# Allegro board BeagleY-AI_PCB_Rev-A_240426.brd
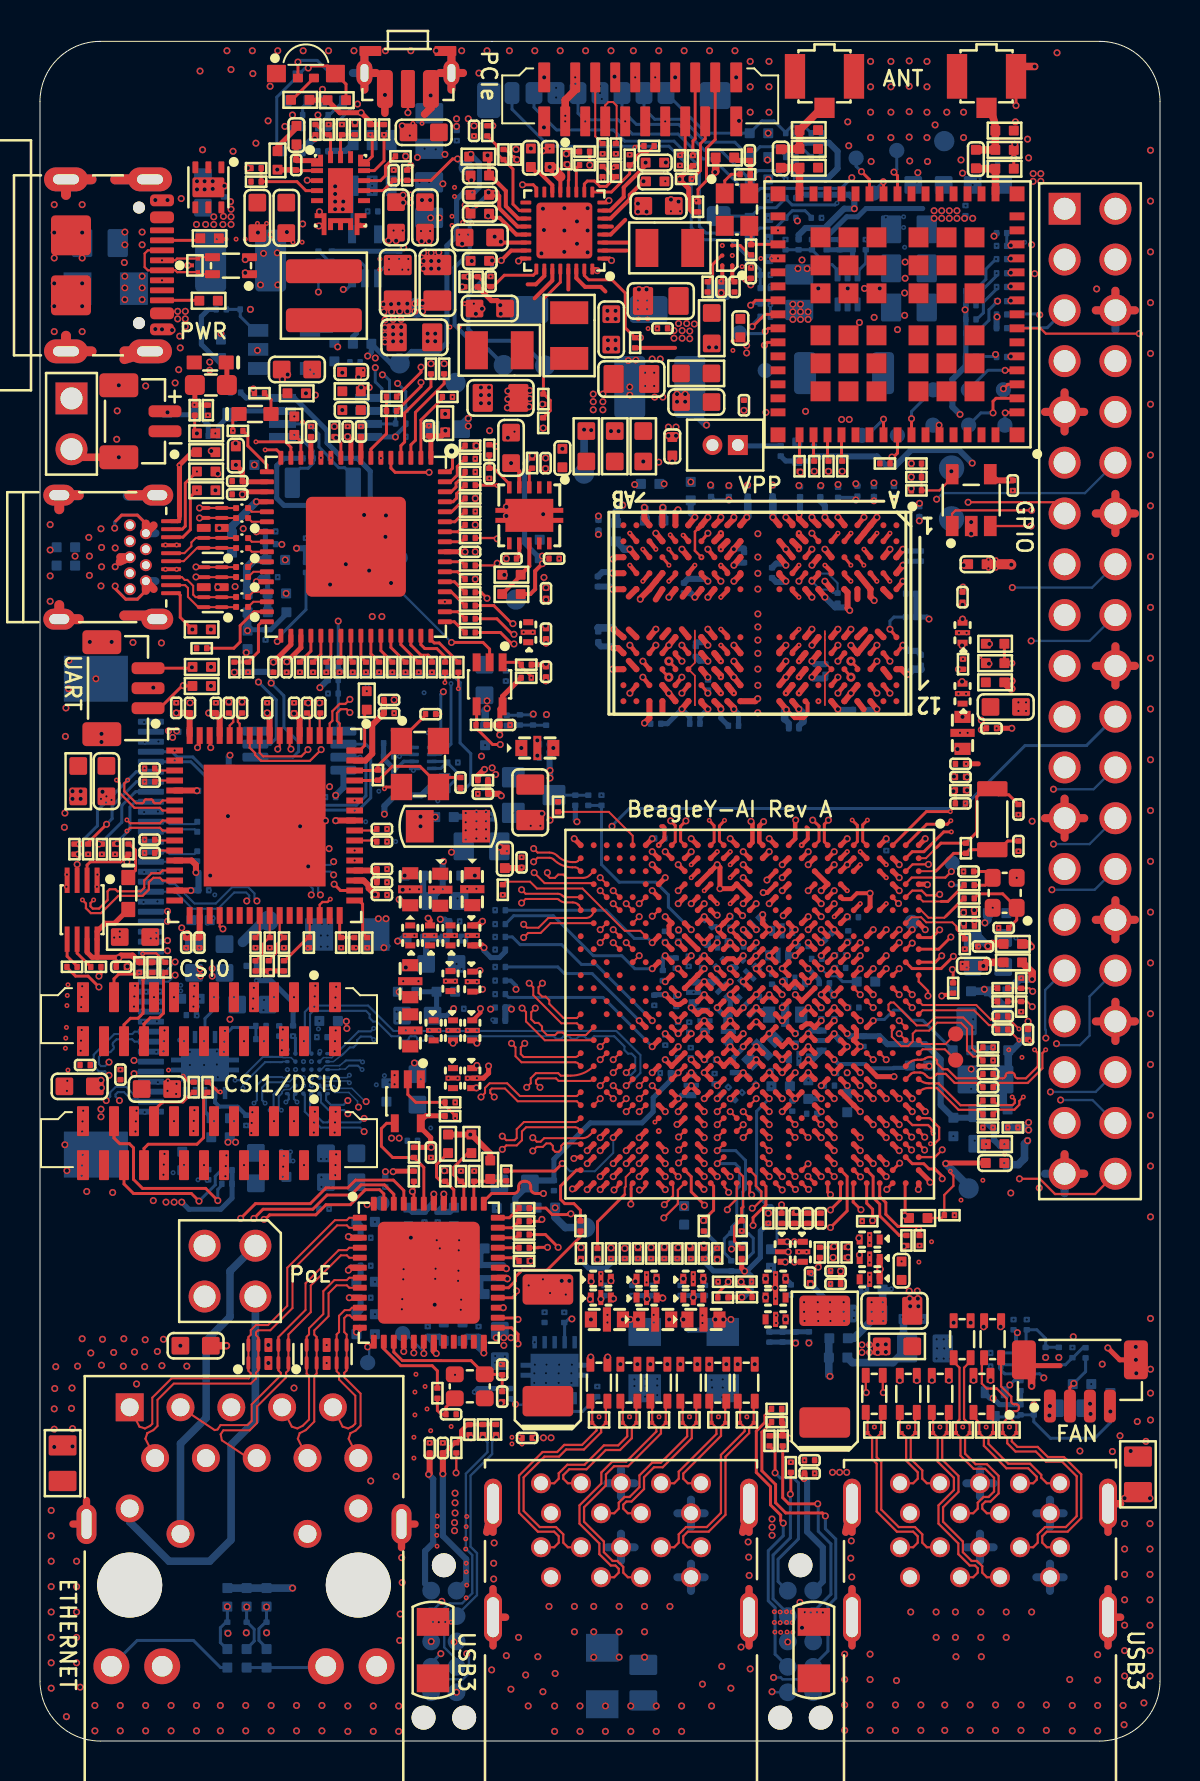
[diagram p0: board, top side]
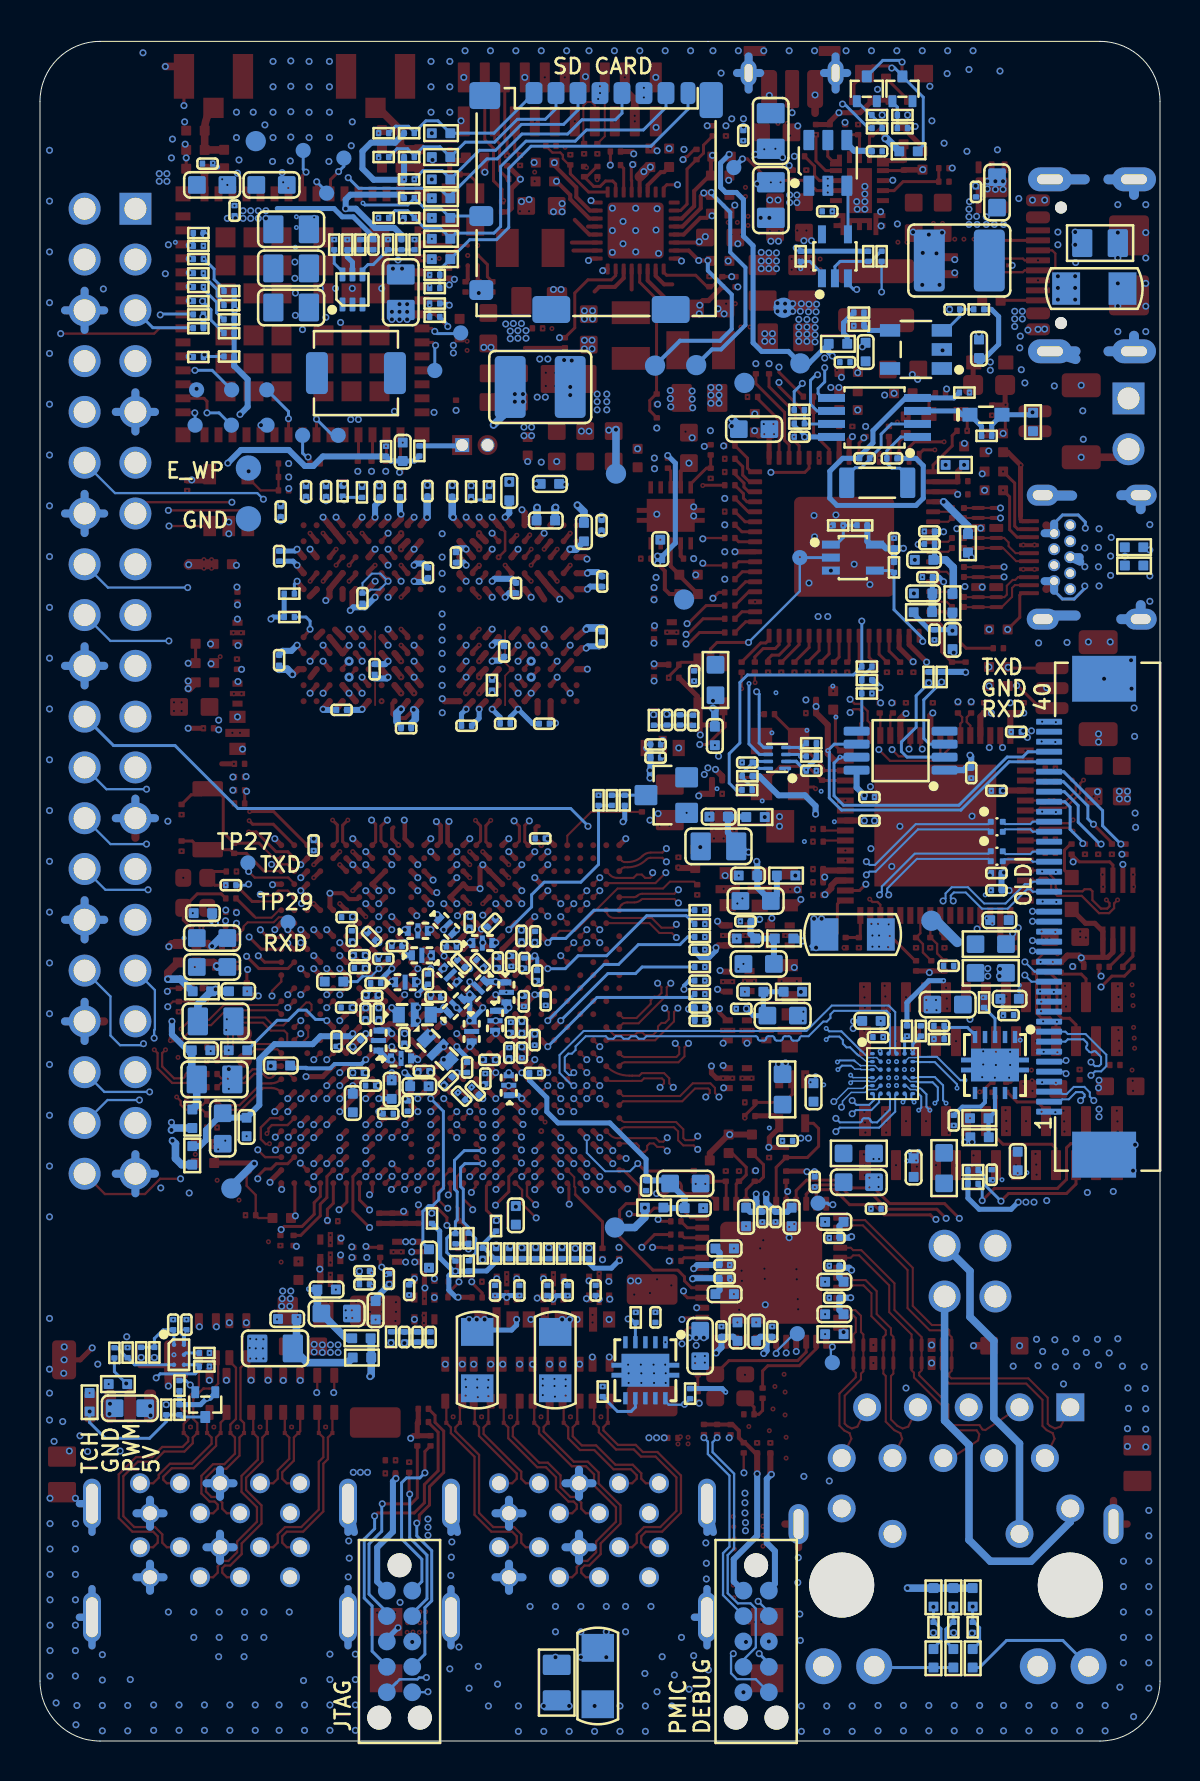
[diagram p1: board, bottom side, seen from below]

Outline 56 x 85 mm; copper layers: TOP, L2-GND1, L3-SIGNAL1, L4-GND2, L5-SIGNAL2, L6-PWR1, L7-PWR2, L8-PWR3, L9-GND, L10-SIGNAL3, L11-GND3, L12-SIGNAL4, L13-GND4, BOTTOM. Coordinates in mm from the lower left corner of the outline.
Outline path: 0,82 0,3 arc(0.88,0.88) 3,0 53,0 arc(55.12,0.88) 56,3 56,82 arc(55.12,84.12) 53,85 3,85 arc(0.88,84.12) 0,82

## Design rules (mm)
constraint set DEFAULT: min track width 0.117
net group B_USB1_DN1_D_P: nets B_USB1_DN1_D_N B_USB1_DN1_D_P
net group B_USB1_DN3_D_P: nets B_USB1_DN3_D_N B_USB1_DN3_D_P
net group B_USB1_SSRX_DN1_P: nets B_USB1_SSRX_DN1_N B_USB1_SSRX_DN1_P
net group B_USB1_SSRX_DN3_P: nets B_USB1_SSRX_DN3_N B_USB1_SSRX_DN3_P
net group B_USB1_SSTX_DN1_P: nets B_USB1_SSTX_DN1_N B_USB1_SSTX_DN1_P
net group B_USB1_SSTX_DN3_P: nets B_USB1_SSTX_DN3_N B_USB1_SSTX_DN3_P
net group C_USB0_DP: nets C_USB0_DM C_USB0_DP
net group C_USB1_SSTX_DN1_P: nets C_USB1_SSTX_DN1_N C_USB1_SSTX_DN1_P
net group C_USB1_SSTX_DN2_P: nets C_USB1_SSTX_DN2_N C_USB1_SSTX_DN2_P
net group C_USB1_SSTX_DN3_P: nets C_USB1_SSTX_DN3_N C_USB1_SSTX_DN3_P
net group C_USB1_SSTX_DN4_P: nets C_USB1_SSTX_DN4_N C_USB1_SSTX_DN4_P
net group C_USBA_SSRX_UP_N: nets C_USBA_SSRX_UP_N C_USBA_SSRX_UP_P
net group CSI0_RX0: nets CSI0_RX0_N CSI0_RX0_P
net group CSI0_RX1: nets CSI0_RX1_N CSI0_RX1_P
net group CSI0_RX2: nets CSI0_RX2_N CSI0_RX2_P
net group CSI0_RX3: nets CSI0_RX3_N CSI0_RX3_P
net group CSI0_RXCLK: nets CSI0_RXCLK_N CSI0_RXCLK_P
net group DP5: nets USB0_DM USB0_DP
net group DSI/CSI_CLK_P: nets DSI/CSI_CLK_N DSI/CSI_CLK_P
net group DSI/CSI_D0_N: nets DSI/CSI_D0_N DSI/CSI_D0_P
net group DSI/CSI_D1_N: nets DSI/CSI_D1_N DSI/CSI_D1_P
net group DSI/CSI_D2_P: nets DSI/CSI_D2_N DSI/CSI_D2_P
net group DSI/CSI_D3_N: nets DSI/CSI_D3_N DSI/CSI_D3_P
net group H20/MMC1_DAT1/ADJ: nets H20/MMC1_DAT1/ADJ SD_DAT1
net group H23/MMC1_DAT0/ADJ: nets H23/MMC1_DAT0/ADJ SD_DAT0
net group H24/MMC1_CLK/ADJ: nets H24/MMC1_CLK/ADJ SD_CLK
net group H25/MMC1_DAT3/ADJ: nets H25/MMC1_DAT3/ADJ SD_DAT3
net group HDMI_TX0-: nets HDMI_TX0+ HDMI_TX0-
net group HDMI_TX1+: nets HDMI_TX1+ HDMI_TX1-
net group HDMI_TX2-: nets HDMI_TX2+ HDMI_TX2-
net group HDMI_TXC-: nets HDMI_TXC+ HDMI_TXC-
net group J23/MMC1_DAT2/ADJ: nets J23/MMC1_DAT2/ADJ SD_DAT2
net group PCIE0_RX0: nets PCIE0_RX0_N PCIE0_RX0_P
net group PCIE0_TX0: nets PCIE0_TX0_N PCIE0_TX0_P
net group PHY_TD_A_M: nets PHY_TD_A_M PHY_TD_A_P
net group PHY_TD_B_M: nets PHY_TD_B_M PHY_TD_B_P
net group PHY_TD_C_M: nets PHY_TD_C_M PHY_TD_C_P
net group PHY_TD_D_M: nets PHY_TD_D_M PHY_TD_D_P
net group SERDES0_REFCLK: nets SERDES0_REFCLK_N SERDES0_REFCLK_P
net group SERDES0_RX0: nets SERDES0_RX0_N SERDES0_RX0_P
net group SERDES0_TX0_: nets SERDES0_TX0_N SERDES0_TX0_P
net group SERDES1_REFCLK: nets SERDES1_REFCLK_N SERDES1_REFCLK_P
net group SERDES1_REFCLK_N_R: nets SERDES1_REFCLK_N_R SERDES1_REFCLK_P_R
net group SERDES1_RX0: nets SERDES1_RX0_N SERDES1_RX0_P
net group SERDES1_TX0: nets SERDES1_TX0_N SERDES1_TX0_P
net group SOC_SERDES1_REFCLK: nets PCIE0_CLK_N PCIE0_CLK_P
net group T_USB1_DN2_D_N: nets T_USB1_DN2_D_N T_USB1_DN2_D_P
net group T_USB1_DN4_D_P: nets T_USB1_DN4_D_N T_USB1_DN4_D_P
net group T_USB1_SSRX_DN2_P: nets T_USB1_SSRX_DN2_N T_USB1_SSRX_DN2_P
net group T_USB1_SSRX_DN4_P: nets T_USB1_SSRX_DN4_N T_USB1_SSRX_DN4_P
net group T_USB1_SSTX_DN2_P: nets T_USB1_SSTX_DN2_N T_USB1_SSTX_DN2_P
net group T_USB1_SSTX_DN4_P: nets T_USB1_SSTX_DN4_N T_USB1_SSTX_DN4_P
net group TX0M: nets TX0M TX0P
net group TX1M: nets TX1M TX1P
net group TX2M: nets TX2M TX2P
net group TXCM: nets TXCM TXCP
net group USB1_DN1_D_P: nets USB1_DN1_D_N USB1_DN1_D_P
net group USB1_DN2_D_N: nets USB1_DN2_D_N USB1_DN2_D_P
net group USB1_DN3_D_P: nets USB1_DN3_D_N USB1_DN3_D_P
net group USB1_DN4_D_P: nets USB1_DN4_D_N USB1_DN4_D_P
net group USB1_HUB_D: nets USB1_HUB_D_N USB1_HUB_D_P
net group USB1_SSRX_DN1_N: nets USB1_SSRX_DN1_N USB1_SSRX_DN1_P
net group USB1_SSRX_DN2_N: nets USB1_SSRX_DN2_N USB1_SSRX_DN2_P
net group USB1_SSRX_DN3_P: nets USB1_SSRX_DN3_N USB1_SSRX_DN3_P
net group USB1_SSRX_DN4_P: nets USB1_SSRX_DN4_N USB1_SSRX_DN4_P
net group USB1_SSTX_DN1_P: nets USB1_SSTX_DN1_N USB1_SSTX_DN1_P
net group USB1_SSTX_DN2_P: nets USB1_SSTX_DN2_N USB1_SSTX_DN2_P
net group USB1_SSTX_DN3_P: nets USB1_SSTX_DN3_N USB1_SSTX_DN3_P
net group USB1_SSTX_DN4_P: nets USB1_SSTX_DN4_N USB1_SSTX_DN4_P
net group USBC_SS_RX0: nets USBC_SS_RX0_N USBC_SS_RX0_P
net group USBC_SS_TX0: nets USBC_SS_TX0_N USBC_SS_TX0_P
net group 40-OHM_PH: nets DDR0_DM0_DBI0# DDR0_DM1_DBI1# DDR0_DM2_DBI2# DDR0_DM3_DBI3# DDR0_DQ0 DDR0_DQ1 DDR0_DQ2 DDR0_DQ4 DDR0_DQ14 DDR0_DQ15 DDR0_DQ18 DDR0_DQ20 DDR0_DQ21 DDR0_DQ24 DDR0_DQ26 DDR0_DQ27 DDR0_DQ28
net group 50-OHM_PH: nets DDR0_CAL0 DDR0_ODT_CA_A DDR0_ODT_CA_B DDR0_RST# DDR0_ZQ0 DDR0_ZQ1
net group 80-OHM_PH: nets DDR0_DQS0_P DDR0_DQS1_N DDR0_DQS3_N
net group CLS1_OLDI0: nets OLDI0_A0_N OLDI0_A0_P OLDI0_A1_N OLDI0_A1_P OLDI0_A2_N OLDI0_A2_P OLDI0_A3_N OLDI0_A3_P OLDI0_CLK0_N OLDI0_CLK0_P SOC_OLDI0_CLK0_N SOC_OLDI0_CLK0_P
net group CLS1_RGMII_TX: nets RGMII1_TD0 RGMII1_TD1 RGMII1_TD2 RGMII1_TD3 RGMII1_TX_CTL RGMII1_TXC TX_CLK
net group CLS1_SD: nets H22/MMC1_CMD/ADJ
net group CLS1_WIFI: nets F27/MMC2_CMD/1V8 G26/MMC2_DAT0/1V8 G27/MMC2_DAT1/1V8 H26/MMC2_CLK/1V8 H27/MMC2_DAT2/1V8 J27/MMC2_DAT3/1V8 WL_SDIO_CLK
net group CLS2_OLDI1: nets OLDI0_A4_N OLDI0_A4_P OLDI0_A5_N OLDI0_A5_P OLDI0_A6_N OLDI0_A6_P OLDI0_A7_N OLDI0_A7_P OLDI0_CLK1_N OLDI0_CLK1_P SOC_OLDI0_CLK1_N SOC_OLDI0_CLK1_P
net group CLS2_RGMII_RX: nets RGMII1_RD0 RGMII1_RD1 RGMII1_RD2 RGMII1_RD3 RGMII1_RX_CTL RGMII1_RXC
net group DDR0_CA: nets DDR0_CA0 DDR0_CA1 DDR0_CA2 DDR0_CA3 DDR0_CA4 DDR0_CA5 DDR0_CK_C DDR0_CK_T DDR0_CKE0 DDR0_CKE1 DDR0_CSN0_0 DDR0_CSN0_1 DDR0_CSN1_0 DDR0_CSN1_1
net group DDR0_CLK: nets DDR0_DQS0_N DDR0_DQS1_P DDR0_DQS2_N DDR0_DQS2_P DDR0_DQS3_P
net group DDR0_DL0: nets DDR0_DQ3 DDR0_DQ5 DDR0_DQ6 DDR0_DQ7
net group DDR0_DL1: nets DDR0_DQ8 DDR0_DQ9 DDR0_DQ10 DDR0_DQ11 DDR0_DQ12 DDR0_DQ13
net group DDR0_DL2: nets DDR0_DQ16 DDR0_DQ17 DDR0_DQ19 DDR0_DQ22 DDR0_DQ23
net group DDR0_DL3: nets DDR0_DQ25 DDR0_DQ29 DDR0_DQ30 DDR0_DQ31
net group PWR: nets VCAP_VDDS0 VCAP_VDDS2 VCAP_VDDS6 VDA_PHY_1V8 VPP_1V8
net group VOUT: nets VOUT0_DATA0 VOUT0_DATA1 VOUT0_DATA2 VOUT0_DATA3 VOUT0_DATA4 VOUT0_DATA5 VOUT0_DATA6 VOUT0_DATA7 VOUT0_DATA8 VOUT0_DATA9 VOUT0_DATA10 VOUT0_DATA11 VOUT0_DATA12 VOUT0_DATA13 VOUT0_DATA14 VOUT0_DATA15 VOUT0_DATA16 VOUT0_DATA17 VOUT0_DATA18 VOUT0_DATA19 VOUT0_DATA20 VOUT0_DATA21 VOUT0_DATA22 VOUT0_DATA23 VOUT0_HSYNC VOUT0_PCLK VOUT0_VSYNC

## Placement (name value [footprint] x y rotation side)
C1  22uF  [C0805]  19.46 80.52 270 bottom
C2  100nF  [C0201]  20.84 80.29 270 bottom
C3  10uF  [C0603]  47.4 77.82 180 bottom
C4  10uF  [C0603]  44.42 77.82 180 bottom
C5  100nF  [C0201]  47.62 78.89 180 bottom
C6  100nF  [C0201]  9.2 77.47 90 bottom
C7  10uF  [C0603]  8.15 77.45 90 bottom
C8  22uF  [C0805]  19.46 77.06 90 bottom
C9  100nF  [C0201]  16.64 76.5 180 bottom
C10  100nF  [C0201]  46.27 76.53 90 bottom
C11  22uF  [C0805]  43.44 71.69 180 bottom
C12  22uF  [C0805]  43.44 73.65 180 bottom
C13  22uF  [C0805]  43.44 75.6 180 bottom
C14  100uF  [C1210]  10.03 74.04 0 bottom
C15  1nF  [C1206]  3.28 72.64 180 bottom
C16  100nF  [C0201]  10.27 71.6 0 bottom
C17  22uF  [C0805]  37.96 72.46 90 bottom
C18  120pF  [C0201]  39.33 74.83 270 bottom
C19  1uF  [C0402]  9.05 69.63 90 bottom
C20  2.2uF  [C0402]  14.72 69.46 90 bottom
C21  100nF  [C0201]  15.75 68.96 0 bottom
C22  100uF  [C1210]  30.99 67.72 0 bottom
C23  10uF  [C0603]  20.3 65.61 180 bottom
C24  100nF  [C0201]  18.03 65.23 0 bottom
C25  2.2uF  [C0402]  37.86 64.48 90 bottom
C26  2.4pF  [C0201]  14.77 64.15 0 bottom
C27  2.4pF  [C0201]  13.4 64.15 180 bottom
C28  10uF  [C0402]  30.51 62.87 180 bottom
C29  10nF  [C0201]  36.63 62.51 90 bottom
C30  1uF  [C0402]  32.54 62.51 90 bottom
C31  10nF  [C0201]  35.39 62.5 90 bottom
C32  10nF  [C0201]  42.7 62.49 90 bottom
C33  100nF  [C0201]  41.7 62.49 90 bottom
C34  10nF  [C0201]  38 62.48 90 bottom
C35  10nF  [C0201]  39.02 62.48 90 bottom
C36  10nF  [C0201]  43.97 61.48 90 bottom
C37  1uF  [C0402]  30.71 61.04 180 bottom
C38  10nF  [C0201]  27.92 60.8 90 bottom
C39  10nF  [C0201]  11.53 60.49 0 bottom
C40  1uF  [C0402]  28.8 60.46 90 bottom
C41  100nF  [C0201]  13.3 59.9 90 bottom
C42  100nF  [C0201]  11.53 59.86 0 bottom
C43  10uF  [C0402]  24.99 59.62 90 bottom
C44  10nF  [C0201]  44.04 59.26 90 bottom
C45  10nF  [C0201]  35.2 59.19 90 bottom
C46  10uF  [C0402]  11.8 59.07 0 bottom
C47  10nF  [C0201]  36.6 58.42 270 bottom
C48  100nF  [C0201]  11.63 58.21 0 bottom
C49  100nF  [C0201]  27.89 57.99 270 bottom
C50  100nF  [C0201]  32.2 57.66 270 bottom
C51  10uF  [C0402]  11.84 57.39 0 bottom
C52  10nF  [C0201]  39.88 57.15 270 bottom
C53  100nF  [C0201]  11.28 55.32 270 bottom
C54  10nF  [C0201]  27.92 55.22 90 bottom
C55  10uF  [C0402]  10.38 55.07 270 bottom
C56  10nF  [C0201]  32.79 54.49 90 bottom
C57  10nF  [C0201]  44.04 54.05 270 bottom
C58  10nF  [C0201]  39.27 53.6 270 bottom
C59  100nF  [C0201]  23.29 53.26 270 bottom
C60  10nF  [C0201]  40.92 51.57 0 bottom
C61  100nF  [C0201]  24.65 51.06 90 bottom
C62  100nF  [C0201]  23.99 51.06 90 bottom
C63  100nF  [C0201]  23.34 51.05 90 bottom
C64  10nF  [C0201]  32.74 50.88 0 bottom
C65  10nF  [C0201]  30.79 50.88 180 bottom
C66  10nF  [C0201]  34.67 50.77 0 bottom
C67  10nF  [C0201]  37.69 50.65 0 bottom
C68  100nF  [C0201]  7.19 50.47 0 bottom
C69  10uF  [C0402]  22.26 50.27 270 bottom
C70  100nF  [C0201]  25.22 49.84 180 bottom
C71  100nF  [C0201]  25.22 49.18 180 bottom
C72  100nF  [C0201]  9.44 48.41 270 bottom
C73  100nF  [C0201]  8.18 47.52 0 bottom
C74  100nF  [C0201]  14.53 47.2 180 bottom
C75  1uF  [C0402]  22.07 46.23 0 bottom
C76  100nF  [C0201]  14.53 46.03 180 bottom
C77  100nF  [C0201]  30.99 45.14 0 bottom
C78  100nF  [C0201]  42.32 44.78 270 bottom
C79  22uF  [C0805]  22.08 44.74 0 bottom
C80  100nF  [C0201]  8.18 43.41 0 bottom
C81  1uF  [C0402]  20.6 43.28 0 bottom
C82  100nF  [C0201]  46.46 42.8 0 bottom
C83  100nF  [C0201]  8.18 42.55 0 bottom
C84  4.7uF  [C0603]  20.22 42.01 0 bottom
C85  1uF  [C0402]  47.85 41.4 0 bottom
C86  100nF  [C0201]  40.67 41.2 0 bottom
C87  100nF  [C0201]  20.73 40.99 0 bottom
C88  100nF  [C0201]  34.52 40.95 270 bottom
C89  100nF  [C0201]  33.43 40.9 135 bottom
C90  1uF  [EMIFIL_0402_3P]  35.68 40.76 225 bottom
C91  1uF  [C0402]  8.03 41.05 0 bottom
C92  1uF  [EMIFIL_0402_3P]  37.11 40.52 180 bottom
C93  100uF  [C1206]  15.37 40.34 180 bottom
C94  100nF  [C0201]  40.41 40.26 90 bottom
C95  100nF  [C0201]  31.93 40.26 90 bottom
C96  100nF  [C0201]  31.24 40.24 90 bottom
C97  100nF  [C0201]  39.42 40.24 45 bottom
C98  4.7uF  [C0603]  47.4 40.16 0 bottom
C99  1uF  [C0402]  20.7 40.13 0 bottom
C100  1uF  [EMIFIL_0402_3P]  33.88 39.91 180 bottom
C101  100nF  [C0201]  38.15 39.76 0 bottom
C102  100nF  [C0201]  35.43 39.73 180 bottom
C103  100nF  [C0201]  23.01 39.58 180 bottom
C104  100nF  [C0201]  40.03 39.3 0 bottom
C105  1uF  [EMIFIL_0402_3P]  36.91 39.29 180 bottom
C106  100nF  [C0201]  38.84 39.12 180 bottom
C107  100nF  [C0201]  32.43 39 270 bottom
C108  100nF  [C0201]  33.1 38.93 270 bottom
C109  100nF  [C0201]  31.78 38.91 90 bottom
C110  100nF  [C0201]  33.98 38.89 45 bottom
C111  100nF  [C0201]  34.95 38.87 45 bottom
C112  4.7uF  [C0603]  20.07 38.86 0 bottom
C113  4.7uF  [C0603]  47.4 38.71 0 bottom
C114  100nF  [C0201]  40.03 38.66 0 bottom
C115  100nF  [C0201]  10.57 38.77 0 bottom
C116  1uF  [EMIFIL_0402_3P]  35.48 38.31 225 bottom
C117  100nF  [C0201]  31.14 38.28 90 bottom
C118  100nF  [C0201]  36.6 38.1 90 bottom
C119  100nF  [C0201]  23.01 38.03 180 bottom
C120  1uF  [C0402]  41.3 37.98 0 bottom
C121  1uF  [EMIFIL_0402_3P]  37.74 37.95 180 bottom
C122  100nF  [C0201]  39.22 37.9 0 bottom
C123  1uF  [EMIFIL_0402_3P]  34.09 37.65 315 bottom
C124  1uF  [C0402]  46.09 37.5 180 bottom
C125  1uF  [C0402]  20.29 37.47 0 bottom
C126  10uF  [C0603]  1.98 32.74 180 top
C127  1uF  [EMIFIL_0402_3P]  32.68 37.44 270 bottom
C128  4.7uF  [C0603]  10.62 36.83 0 bottom
C129  100nF  [C0201]  39.4 37.27 0 bottom
C130  100nF  [C0201]  36.22 37.22 180 bottom
C131  1uF  [C0402]  7.52 37.12 0 bottom
C132  100nF  [C0201]  30.72 37.05 270 bottom
C133  100nF  [C0201]  31.81 36.99 270 bottom
C134  1uF  [EMIFIL_0402_3P]  35.21 36.75 135 bottom
C135  100nF  [C0201]  40.69 36.68 0 bottom
C136  100nF  [C0201]  23.01 36.68 180 bottom
C137  100nF  [C0201]  20.94 36.62 0 bottom
C138  100nF  [C0201]  39.73 36.38 90 bottom
C139  100nF  [C0201]  39.06 36.38 270 bottom
C140  10uF  [EMIFIL_0603_3P]  37.26 36.33 180 bottom
C141  100nF  [C0201]  7.57 36.3 0 bottom
C142  4.7uF  [C0603]  18.87 36.28 180 bottom
C143  1uF  [EMIFIL_0402_3P]  33.25 36.02 270 bottom
C144  100nF  [C0201]  23.01 36.02 180 bottom
C145  2.2uF  [C0402]  14.43 36.01 180 bottom
C146  22uF  [C0805]  47.22 35.99 180 bottom
C147  100nF  [C0201]  32.46 35.69 90 bottom
C148  100nF  [C0201]  31.9 35.69 90 bottom
C149  1uF  [EMIFIL_0402_3P]  34.42 35.49 270 bottom
C150  100nF  [C0201]  14.1 35.2 180 bottom
C151  100nF  [C0201]  37.79 35.15 270 bottom
C152  100nF  [C0201]  31.27 35.06 270 bottom
C153  1uF  [EMIFIL_0402_3P]  39.08 35.03 90 bottom
C154  100nF  [C0201]  41.18 34.99 270 bottom
C155  100nF  [C0201]  40.16 34.88 315 bottom
C156  10uF  [EMIFIL_0603_3P]  36.12 34.57 225 bottom
C157  1uF  [C0402]  47.95 34.54 180 bottom
C158  100nF  [C0201]  32.54 34.42 90 bottom
C159  100nF  [C0201]  31.9 34.42 270 bottom
C160  1uF  [EMIFIL_0402_3P]  37.95 34.14 180 bottom
C161  100nF  [C0201]  33.53 34.07 0 bottom
C162  1uF  [C0402]  43.96 33.78 0 bottom
C163  100nF  [C0201]  34.65 33.68 270 bottom
C164  100nF  [C0201]  36.8 33.51 0 bottom
C165  100nF  [C0201]  40.08 33.41 0 bottom
C166  100nF  [C0201]  31.27 33.41 180 bottom
C167  100nF  [C0201]  33.73 33.13 90 bottom
C168  22uF  [C0805]  47.27 33.09 180 bottom
C169  100nF  [C0201]  35.59 33.02 135 bottom
C170  1uF  [EMIFIL_0402_3P]  32.56 32.8 90 bottom
C171  100nF  [C0201]  39.47 32.78 0 bottom
C172  1uF  [C0402]  37.03 32.75 180 bottom
C173  1uF  [C0402]  38.42 32.58 90 bottom
C174  100nF  [C0201]  34.24 32.52 45 bottom
C175  10uF  [C0402]  17.32 32.44 90 bottom
C176  100nF  [C0201]  34.93 32.25 45 bottom
C177  1uF  [C0402]  40.36 31.91 270 bottom
C178  100nF  [C0201]  37.62 31.75 270 bottom
C179  100nF  [C0201]  38.59 31.37 180 bottom
C180  10nF  [C0201]  10.31 31.04 270 bottom
C181  1uF  [C0402]  45.67 30.71 270 bottom
C182  4.7uF  [C0603]  46.86 30.63 270 bottom
C183  10nF  [C0201]  18.62 30.02 0 bottom
C184  10uF  [C0402]  7.11 29.01 270 bottom
C185  10uF  [C0402]  12.32 28.68 90 bottom
C186  100nF  [C0201]  8.42 28.32 270 bottom
C187  10nF  [C0201]  17.27 27.96 270 bottom
C188  10uF  [C0603]  15.06 27.95 180 bottom
C189  4.7uF  [C0603]  23.73 27.88 180 bottom
C190  100nF  [C0201]  25.7 27.78 270 bottom
C191  1uF  [C0402]  23.3 26.65 180 bottom
C192  10nF  [C0201]  14.2 26.62 0 bottom
C193  1uF  [C0402]  32.21 26.29 270 bottom
C194  1uF  [C0402]  20.7 26.21 270 bottom
C195  100nF  [C0201]  19.88 26.21 270 bottom
C196  100nF  [C0201]  19.22 26.21 270 bottom
C197  1uF  [C0402]  18.42 26.21 270 bottom
C198  1uF  [C0402]  16.28 25.96 0 bottom
C199  100nF  [C0201]  16.28 25.17 0 bottom
C200  1uF  [C0402]  21.77 24.63 180 bottom
C201  1uF  [C0402]  36.55 24.13 270 bottom
C202  100nF  [C0201]  21.77 23.81 180 bottom
C203  100nF  [C0201]  16.28 23.77 0 bottom
C204  100nF  [C0201]  39.78 23.5 180 bottom
C205  100nF  [C0201]  21.77 23.15 180 bottom
C206  100nF  [C0201]  38.56 23.11 90 bottom
C207  1uF  [C0402]  16.28 22.97 0 bottom
C208  100nF  [C0201]  39.78 22.83 180 bottom
C209  1uF  [C0402]  41.67 22.58 180 bottom
C210  100nF  [C0201]  37.54 22.56 270 bottom
C211  100nF  [C0201]  33.25 22.53 270 bottom
C212  100nF  [C0201]  32.03 22.53 270 bottom
C213  100nF  [C0201]  30.63 22.53 270 bottom
C214  100nF  [C0201]  28.22 22.53 270 bottom
C215  100nF  [C0201]  29.62 22.53 270 bottom
C216  1uF  [C0402]  21.77 22.35 180 bottom
C217  100nF  [C0201]  16.28 22.17 0 bottom
C218  1uF  [C0402]  39.22 21.54 270 bottom
C219  4.7uF  [C0603]  41.17 21.38 180 bottom
C220  1uF  [C0402]  16.28 21.34 0 bottom
C221  100nF  [C0201]  25.23 21.19 90 bottom
C222  1uF  [C0402]  43.64 21.11 0 bottom
C223  100nF  [C0201]  49.34 20.82 90 bottom
C224  100nF  [C0201]  48.68 20.82 90 bottom
C225  100nF  [C0201]  21.93 20.47 90 bottom
C226  1uF  [C0402]  21.13 20.47 90 bottom
C227  1uF  [C0402]  20.19 20.47 90 bottom
C228  100nF  [C0201]  19.39 20.47 90 bottom
C229  100nF  [C0201]  37.78 20.2 270 bottom
C230  100nF  [C0201]  37.13 20.2 270 bottom
C231  100nF  [C0201]  36.47 20.2 270 bottom
C232  10uF  [C0603]  22.99 19.76 270 bottom
C233  22uF  [C0805]  44.25 19.63 0 bottom
C234  100uF  [C1206]  34.14 19.05 270 bottom
C235  100uF  [C1206]  30.24 19.05 270 bottom
C236  10uF  [C0603]  51.5 16.64 0 bottom
C237  1nF  [C1206]  38.69 4.55 270 top
C238  100nF  [C0201]  21.7 80.52 270 top
C239  10uF  [C0603]  19.18 80.45 180 top
C240  1800pF  [C0402]  12.82 80.31 270 top
C241  100nF  [C0201]  35.49 79.3 90 top
C242  2.2uF  [C0402]  24.54 79.18 90 top
C243  2.2uF  [C0402]  25.48 79.18 90 top
C244  10pF  [C0402]  37.04 79.14 90 top
C245  10pF  [C0402]  46.79 79.12 90 top
C246  2.2uF  [C0402]  30.74 78.94 0 top
C247  10pF  [C0201]  12.81 78.82 90 top
C248  10pF  [C0201]  17.68 78.31 90 top
C249  2.2uF  [C0402]  21.99 78.29 180 top
C250  2.2uF  [C0402]  30.76 78 0 top
C251  2.2uF  [C0402]  21.99 77.33 180 top
C252  10uF  [C0603]  30.93 76.77 0 top
C253  2.2uF  [C0402]  21.99 76.39 180 top
C254  10uF  [C0603]  17.8 76.2 270 top
C255  10uF  [C0603]  19.25 76.2 270 top
C256  10uF  [C0603]  10.87 76.17 270 top
C257  10uF  [C0603]  12.31 76.17 270 top
C258  4.7uF  [C0603]  21.99 75.19 180 top
C259  2.2uF  [C0402]  21.99 74.02 180 top
C260  100nF  [C0201]  35.54 73.41 90 top
C261  100nF  [C0201]  22.53 72.99 90 top
C262  47uF  [C0805]  17.89 72.93 90 top
C263  47uF  [C0805]  19.87 72.93 90 top
C264  100nF  [C0201]  34.07 72.72 270 top
C265  100nF  [C0201]  34.73 72.72 270 top
C266  47uF  [C0805]  31.04 72.02 180 top
C267  10uF  [C0603]  22.49 71.64 180 top
C268  10uF  [C0402]  35.02 70.66 270 top
C269  100nF  [C0201]  31.13 70.65 180 top
C270  10uF  [C0603]  28.56 70.6 270 top
C271  47uF  [C0805]  18.72 70.2 0 top
C272  10uF  [C0603]  12.85 68.59 0 top
C273  10uF  [C0402]  15.56 68.46 0 top
C274  47uF  [C0805]  29.57 68.12 0 top
C275  47uF  [C0805]  23.03 67.17 0 top
C276  10uF  [C0603]  32.82 66.96 180 top
C277  100nF  [C0201]  35.2 66.8 270 top
C278  10uF  [C0402]  15.58 66.56 180 top
C279  100nF  [C0201]  19.45 65.53 90 top
C280  100nF  [C0201]  13.55 65.49 90 top
C281  100nF  [C0201]  15.38 65.49 90 top
C282  100nF  [C0201]  16.04 65.49 90 top
C283  10uF  [C0402]  31.62 64.75 90 top
C284  4.7uF  [C0603]  23.55 64.67 90 top
C285  10uF  [C0402]  9.79 64.28 90 top
C286  1uF  [C0402]  26.12 64.16 90 top
C287  100nF  [C0201]  25.28 63.91 90 top
C288  100nF  [C0201]  9.86 63.01 180 top
C289  100nF  [C0201]  48.64 62.79 270 top
C290  100nF  [C0201]  9.86 62.35 180 top
C291  100nF  [C0201]  21.51 59.47 0 top
C292  10nF  [C0201]  23.57 59.13 180 top
C293  100nF  [C0201]  25.71 59.13 0 top
C294  10uF  [C0402]  46.87 58.85 0 top
C295  10nF  [C0201]  25.3 57.4 90 top
C296  10nF  [C0201]  46.13 57.21 90 top
C297  1uF  [EMIFIL_0402_3P]  24.41 55.45 90 top
C298  1uF  [EMIFIL_0402_3P]  46.13 55.43 90 top
C299  10nF  [C0201]  25.3 55.38 90 top
C300  100nF  [C0201]  11.67 53.7 270 top
C301  100nF  [C0201]  12.33 53.7 270 top
C302  10nF  [C0201]  25.3 53.47 90 top
C303  1uF  [EMIFIL_0402_3P]  46.13 52.38 90 top
C304  100nF  [C0201]  17.45 52.07 0 top
C305  4.7uF  [C0603]  48.29 51.71 0 top
C306  100nF  [C0201]  6.81 51.67 90 top
C307  100nF  [C0201]  7.5 51.67 90 top
C308  100nF  [C0201]  8.79 51.67 90 top
C309  220nF  [C0201]  9.44 51.67 90 top
C310  220nF  [C0201]  10.1 51.67 90 top
C311  100nF  [C0201]  11.36 51.67 90 top
C312  100nF  [C0201]  12.71 51.67 90 top
C313  220nF  [C0201]  13.35 51.67 90 top
C314  220nF  [C0201]  14.02 51.67 90 top
C315  100nF  [C0201]  17.45 51.4 0 top
C316  27pF  [C0201]  19.53 51.35 180 top
C317  100nF  [C0201]  23.25 50.81 0 top
C318  100nF  [C0201]  47.57 50.65 0 top
C319  10uF  [EMIFIL_0603_3P]  46.13 50.42 90 top
C320  10uF  [EMIFIL_0603_3P]  24.87 49.66 0 top
C321  100nF  [C0201]  46.03 48.87 0 top
C322  220nF  [C0201]  5.48 48.64 180 top
C323  100nF  [C0201]  46.03 48.21 0 top
C324  10uF  [C0603]  3.32 48 270 top
C325  220nF  [C0201]  5.48 47.97 180 top
C326  27pF  [C0201]  21.03 47.93 90 top
C327  100nF  [C0201]  22.14 47.37 180 top
C328  22uF  [C0805]  24.51 46.94 270 top
C329  100nF  [C0201]  46.02 46.89 0 top
C330  15pF  [C0201]  48.92 46.58 270 top
C331  100uF  [C1206]  20.4 45.75 0 top
C332  220nF  [C0201]  17.1 45.61 180 top
C333  220nF  [C0201]  5.48 45.08 180 top
C334  220nF  [C0201]  17.1 44.98 180 top
C335  15pF  [C0201]  48.92 44.76 270 top
C336  220nF  [C0201]  5.48 44.42 180 top
C337  1uF  [C0402]  23.24 44.12 90 top
C338  100nF  [C0201]  24.08 43.94 90 top
C339  100nF  [C0201]  17.1 43.61 0 top
C340  15pF  [C0201]  46.43 43.49 180 top
C341  100nF  [C0201]  17.1 42.95 0 top
C342  10uF  [EMIFIL_0603_3P]  21.62 42.6 270 top
C343  10uF  [EMIFIL_0603_3P]  18.51 42.6 90 top
C344  10uF  [EMIFIL_0603_3P]  20.01 42.57 270 top
C345  100nF  [C0201]  17.1 42.31 0 top
C346  15pF  [C0201]  48.18 40.67 180 top
C347  1uF  [EMIFIL_0402_3P]  18.51 40.29 90 top
C348  1uF  [EMIFIL_0402_3P]  19.5 40.29 90 top
C349  1uF  [EMIFIL_0402_3P]  20.52 40.29 90 top
C350  1uF  [EMIFIL_0402_3P]  21.62 40.29 270 top
C351  100nF  [C0201]  7.31 39.93 270 top
C352  100nF  [C0201]  7.97 39.93 270 top
C353  100nF  [C0201]  47.15 39.74 180 top
C354  1uF  [C0402]  46.69 38.77 180 top
C355  100nF  [C0201]  2.26 33.81 180 top
C356  100nF  [C0201]  4.06 38.72 0 top
C357  1uF  [EMIFIL_0402_3P]  20.52 38 270 top
C358  10uF  [EMIFIL_0603_3P]  18.51 38 270 top
C359  1uF  [EMIFIL_0402_3P]  21.62 37.98 270 top
C360  1nF  [C1206]  28.11 3.25 270 bottom
C361  1nF  [C1206]  19.65 4.55 270 top
C362  220nF  [C0201]  48.14 36.24 0 top
C363  220nF  [C0201]  48.14 35.59 0 top
C364  10uF  [EMIFIL_0603_3P]  18.51 35.54 270 top
C365  1uF  [EMIFIL_0402_3P]  19.68 35.54 270 top
C366  1uF  [EMIFIL_0402_3P]  20.65 35.54 270 top
C367  1uF  [EMIFIL_0402_3P]  21.62 35.54 270 top
C368  100nF  [C0201]  49.4 35.34 270 top
C369  220nF  [C0201]  47.4 33.36 0 top
C370  1uF  [EMIFIL_0402_3P]  20.65 33.15 270 top
C371  1uF  [EMIFIL_0402_3P]  21.62 33.15 270 top
C372  10uF  [C0603]  5.84 32.61 0 top
C373  220nF  [C0201]  47.4 32.7 0 top
C374  100nF  [C0201]  4.02 33.33 90 top
C375  100nF  [C0201]  19.54 29.43 270 top
C376  1uF  [C0402]  47.75 28.91 0 top
C377  100nF  [C0201]  37.73 26.14 90 top
C378  100nF  [C0201]  38.38 26.14 90 top
C379  100nF  [C0201]  39.04 26.14 90 top
C380  1uF  [EMIFIL_0402_3P]  41.48 25.08 180 top
C381  1uF  [EMIFIL_0402_3P]  37.14 24.47 270 top
C382  1uF  [EMIFIL_0402_3P]  38.14 24.47 270 top
C383  1uF  [EMIFIL_0402_3P]  41.48 24.1 180 top
C384  1uF  [C0402]  43.08 23.52 90 top
C385  100nF  [C0201]  39.78 23.5 180 top
C386  100nF  [C0201]  38.5 23.18 90 top
C387  1uF  [EMIFIL_0402_3P]  28.04 23.12 0 top
C388  1uF  [EMIFIL_0402_3P]  30.33 23.12 0 top
C389  1uF  [EMIFIL_0402_3P]  32.66 23.12 0 top
C390  1uF  [EMIFIL_0402_3P]  36.78 23.12 0 top
C391  1uF  [EMIFIL_0402_3P]  41.48 23.09 180 top
C392  100nF  [C0201]  39.78 22.86 180 top
C393  1uF  [EMIFIL_0402_3P]  28.04 22.18 0 top
C394  1uF  [EMIFIL_0402_3P]  30.33 22.18 0 top
C395  1uF  [EMIFIL_0402_3P]  32.66 22.18 0 top
C396  1uF  [EMIFIL_0402_3P]  36.78 22.18 0 top
C397  22uF  [C0805]  42.72 21.51 180 top
C398  1uF  [EMIFIL_0402_3P]  36.78 21.09 0 top
C399  10uF  [EMIFIL_0603_3P]  28.35 21.08 0 top
C400  10uF  [EMIFIL_0603_3P]  30.76 21.08 0 top
C401  10uF  [EMIFIL_0603_3P]  33.17 21.08 0 top
C402  150uF  [AVX_C]  25.39 19.79 90 top
C403  100nF  [C0603]  7.78 19.77 180 top
C404  150uF  [AVX_C]  39.24 18.72 90 top
C405  27pF  [C0201]  23.11 18.57 90 top
C406  27pF  [C0201]  23.11 17.22 270 top
C407  27pF  [C0201]  20.55 16.34 0 top
C408  100nF  [C0201]  24.36 15.16 180 top
C409  100nF  [C0201]  19.48 14.65 90 top
C410  100nF  [C0201]  20.14 14.65 90 top
C411  100nF  [C0201]  38.48 14.04 180 top
C412  100nF  [C0201]  38.48 13.39 0 top
C413  100nF  [C0201]  11.05 35.76 0 bottom
C414  100nF  [C0201]  22.47 63.4 270 top
C415  120pF  [C0201]  14.15 79.5 180 bottom
C416  100pF  [C0201]  20.64 48.93 0 bottom
C417  100nF  [C0201]  17.44 48.53 180 bottom
D1  TPD1E1B04DPYR  [D0402]  35.95 80.41 180 bottom
D2  TPD1E1B04DPYR  [D0402]  35.95 79.22 180 bottom
D3  TPD1E1B04DPYR  [D0402]  35.95 78.1 180 bottom
D4  TPD1E1B04DPYR  [D0402]  35.95 77.16 180 bottom
D5  TPD1E1B04DPYR  [D0402]  35.95 76.17 180 bottom
D6  TPD1E1B04DPYR  [D0402]  35.95 75.13 180 bottom
D7  TPD1E1B04DPYR  [D0402]  35.95 74.11 180 bottom
D8  LRB520S-30T1G  [SOD_523]  8.7 66.33 0 bottom
D9  TPD1E1B04DPYR  [D0402]  6.35 65.96 90 bottom
D10  6.8V  [SOT23]  24.68 47.31 180 bottom
D11  TPD1E10B06DPYR  [D0402]  52.1 17.85 180 bottom
D12  TPD1E10B06DPYR  [D0402]  53.52 16.94 270 bottom
D13  TPD1E0B04DPYR  [D0402]  38.44 80.56 180 top
D14  TPD1E0B04DPYR  [D0402]  48.23 80.54 180 top
D15  LRB520S-30T1G  [SOD_523]  8.51 68.94 0 top
D16  LRB520S-30T1G  [SOD_523]  10.75 66.37 180 top
D17  TPD1E10B06DPYR  [D0402]  8.31 65.39 180 top
D18  TPD1E10B06DPYR  [D0402]  8.31 64.45 180 top
D19  TPD1E10B06DPYR  [D0402]  8.31 63.49 180 top
D20  TPD1E10B06DPYR  [D0402]  8.31 62.55 180 top
D21  TPD1E10B06DPYR  [D0402]  8.08 55.59 180 top
D22  TPD1E1B04DPYR  [D0402]  8.09 53.72 180 top
D23  TPD1E1B04DPYR  [D0402]  8.08 52.76 180 top
D24  LRB520S-30T1G  [SOD_523]  4.41 42.38 90 top
D25  ESD122DMXR  [X2SON3_0D3_0_6X1X0_4MM]  27.95 16.06 270 top
D26  ESD122DMXR  [X2SON3_0D3_0_6X1X0_4MM]  29.48 16.06 270 top
D27  ESD122DMXR  [X2SON3_0D3_0_6X1X0_4MM]  30.95 16.06 270 top
D28  ESD122DMXR  [X2SON3_0D3_0_6X1X0_4MM]  32.47 16.06 270 top
D29  ESD122DMXR  [X2SON3_0D3_0_6X1X0_4MM]  33.92 16.06 270 top
D30  ESD122DMXR  [X2SON3_0D3_0_6X1X0_4MM]  35.34 16.06 270 top
D31  ESD122DMXR  [X2SON3_0D3_0_6X1X0_4MM]  41.72 15.55 270 top
D32  ESD122DMXR  [X2SON3_0D3_0_6X1X0_4MM]  43.42 15.55 270 top
D33  ESD122DMXR  [X2SON3_0D3_0_6X1X0_4MM]  45 15.55 270 top
D34  ESD122DMXR  [X2SON3_0D3_0_6X1X0_4MM]  46.14 15.55 270 top
D35  ESD122DMXR  [X2SON3_0D3_0_6X1X0_4MM]  47.31 15.55 270 top
D36  ESD122DMXR  [X2SON3_0D3_0_6X1X0_4MM]  48.48 15.55 270 top
D37  ESD122DMXR  [X2SON3_0D3_0_6X1X0_4MM]  7.75 73.8 0 top
F1  100mA  [F0603]  8.54 67.82 180 top
FB1  120R  [L0402]  10.26 63.82 0 bottom
FB4  120R  [L0402]  10.38 56.9 270 bottom
FB5  120R  [L0402]  11.86 56.45 0 bottom
FB6  120R  [L0402]  20.22 46.21 0 bottom
FB7  120R  [L0402]  18.69 43.28 0 bottom
FB8  120R  [L0402]  18.8 40.13 180 bottom
FB9  120R  [L0402]  47.9 37.49 180 bottom
FB10  120R  [L0402]  18.36 37.47 0 bottom
FB11  120R  [L0402]  48.38 31.12 90 bottom
FB12  120R  [L0402]  48.39 29.29 270 bottom
FB13  120R  [L0402]  25.29 26.68 0 bottom
FB14  120R  [L0402]  39.93 20.14 180 bottom
FB15  120R  [L0402]  39.9 19.18 180 bottom
FB16  120R  [L0402]  34.25 79.19 180 top
FB17  120R  [L0603]  33.59 70.66 90 top
FB18  120R  [L0603]  32.81 68.4 0 top
FB19  120R  [L0402]  15.58 67.5 180 top
FB20  120R  [L0402]  12.83 67.4 180 top
FB21  120R  [L0402]  20.26 65.91 90 top
FB22  120R  [L0603]  30.16 64.75 270 top
FB23  120R  [L0402]  47.75 52.95 0 top
FB24  120R  [L0603]  1.91 48 90 top
FB25  120R  [L0402]  48.64 39.86 0 top
FB26  120R  [L0402]  48.64 38.94 180 top
FB27  120R  [L0603]  42.85 19.74 180 top
FB28  120R  [L0402]  21.92 79.24 180 top
FB29  120R  [L0402]  16.1 69.88 0 bottom
FB30  120R  [L0603]  22.23 53.06 270 bottom
FB31  120R  [L0603]  8.46 39.85 0 bottom
FB32  120R  [L0603]  18.87 32.59 270 bottom
FB33  120R  [L0603]  15.06 29.39 0 bottom
FB34  120R  [L0603]  10.8 28.65 270 bottom
FB35  120R  [L0603]  27.32 64.75 270 top
FB36  120R  [L0603]  28.74 64.75 270 top
FB37  120R  [L0603]  4.75 40.21 0 top
FB38  120R  [L0603]  8.46 38.42 180 bottom
J1  1040310811  [SD-1040310811]  28.19 82.66 0 bottom
J2  0.5K-DX-40PWB  [FPC40_0D5_25_4X5_25X2MM]  5.25 41.22 90 bottom
J3  TC2050-IDC  [CONNECT10_1D27_12_4X6_7MM]  38.02 4.98 270 bottom
J4  TC2050-IDC  [CONNECT10_1D27_12_4X6_7MM]  20.19 4.98 270 bottom
J5  U.FL-R-SMT-1(10)  [U-FL3P-SMD-2_6X2_6X1_0MM]  39.22 83.25 270 top
J6  U.FL-R-SMT-1(10)  [U-FL3P-SMD-2_6X2_6X1_0MM]  47.33 83.25 270 top
J7  MTFP65-816SWN-19A72  [FPC16_0D5_13_7X3_5X3_95MM_90D]  30.01 82.1 0 top
J8  USB2.0 Type C  [USB2_0_TYPE_C]  6.05 73.8 0 top
J9  MTWF63-102SRN-01163  [JST2P_1D0_4_2X3X4_9MM]  6.25 66 270 top
J10  Header 1x2 2.54mm  [HEADER2P_2D54_DIP]  1.57 65.87 0 top
J11  Header 1x2 1.27mm  [HEADER2P_1D27_DIP_TOP]  34.26 64.81 270 top
J12  MTHD54-919000-02B23  [HDMI19P_0D4_6_5X7_95X2_9MM]  4.49 59.2 270 top
J13  MTWF63-103SRN-01163  [JST3P_1D0_5_2X3X4_9MM]  5.4 52.65 270 top
J14  Header 2x20 2.54mm  [HEADER2X20P_2D54_DIP]  52.5 52.5 0 top
J15  MTFP65-822SWN-19A72  [FPC22_0D5_16_7X3_5X3_95MM_90D]  8.45 36.1 0 top
J16  MTFP65-822SWN-19A72  [FPC22_0D5_16_7X3_5X3_95MM_90D]  8.45 29.9 0 top
J17  Header 2x2 2.54mm  [HEADER2X2_2_54]  9.5 23.5 270 top
J18  MTWF63-104SRN-01163  [JST4P_1D0_6_2X3X4_9MM]  52 16.75 180 top
J19  LPJG0926HENLS4R  [RJ45_20P_LPJG0926HENL_SLOT]  10.2 7.8 0 top
J20  UBF30-D2112  [USB3_0_2D0_17_5X13_78X15_49MM_SLOT]  29.05 6.19 0 top
J21  UBF30-D2112  [USB3_0_2D0_17_5X13_78X15_49MM_SLOT]  47 6.19 0 top
L1  0.22uH  [L2P_4_2X4_2X1_9MM]  40.2 68.41 0 bottom
L2  90R  [L4P_0_85X0_65MM]  8.16 45.72 270 bottom
L3  90R  [L4P_0_85X0_65MM]  8.16 44.25 270 bottom
L4  1.5nH  [L0402]  38.44 79.62 0 top
L5  1.5nH  [L0402]  48.23 79.57 0 top
L6  1.5nH  [L0402]  38.44 78.68 0 top
L7  1.5nH  [L0402]  48.23 78.63 0 top
L8  0.47uH  [L1008]  31.49 74.67 0 top
L9  90R  [L2012]  9.55 73.78 180 top
L10  110nH  [L2P_4_3X4_3X2MM]  14.19 72.28 270 top
L11  0.47uH  [L1008]  26.46 70.29 270 top
L12  0.47uH  [L1008]  22.97 69.55 180 top
L13  90R  [L4P_0_85X0_65MM]  10.1 61.41 90 top
L14  90R  [L4P_0_85X0_65MM]  10.1 59.91 90 top
L15  90R  [L4P_0_85X0_65MM]  10.1 58.46 90 top
L16  90R  [L4P_0_85X0_65MM]  10.1 56.97 90 top
L17  90R  [L2012]  46.11 20.1 270 top
L18  90R  [L2012]  47.63 20.1 270 top
L19  90R  [L2012]  27.95 17.92 270 top
L20  90R  [L2012]  29.44 17.92 270 top
L21  90R  [L2012]  30.94 17.92 270 top
L22  90R  [L2012]  32.44 17.92 270 top
L23  90R  [L2012]  33.89 17.92 270 top
L24  90R  [L2012]  35.31 17.92 270 top
L25  90R  [L2012]  41.71 17.36 270 top
L26  90R  [L2012]  43.41 17.36 270 top
L27  90R  [L2012]  45.01 17.36 270 top
L28  90R  [L2012]  47.1 17.36 270 top
LED1  XL-3210SURSYGC  [LED4_3_2X1_5X1_0MM]  13.3 82.95 0 top
NOREF  -  []  52.91 0 90 top
NOREF#2  -  []  0 82 0 top
NOREF#3  -  []  -247.42 -124.5 0 top
NOREF#4  -  []  -586.76 214.75 0 top
OSC1  32.768kHz  [X4-SMD-2_5X2_0X1_0MM]  34.85 76.59 270 top
Q1  CJ1012  [SOT_523]  14.66 82.63 0 bottom
Q2  CJ1012  [SOT_523]  12.88 82.63 0 bottom
Q3  CJ1012  [SOT_523]  47.74 16.83 180 bottom
R1  10K  [R0201]  14.15 81.32 180 bottom
R2  10K  [R0201]  12.88 81.32 180 bottom
R3  0R  [R0201]  12.88 80.66 0 bottom
R4  0R  [R0201]  14.15 80.66 180 bottom
R5  0R  [R0201]  38.82 80.41 180 bottom
R6  47K  [R0201]  37.54 80.41 180 bottom
R7  0R  [R0201]  38.82 79.22 180 bottom
R8  47K  [R0201]  37.54 79.22 180 bottom
R9  47K  [R0201]  37.54 78.1 180 bottom
R10  10K  [R0201]  37.54 77.17 180 bottom
R11  0R  [R0201]  38.82 76.17 180 bottom
R12  47K  [R0201]  37.54 76.17 180 bottom
R13  10K  [R0201]  48.08 75.41 0 bottom
R14  0R  [R0805]  3 74.91 180 bottom
R15  0R  [R0201]  48.08 74.77 180 bottom
R16  10K  [R0201]  17.97 74.25 270 bottom
R17  10K  [R0201]  14.59 74.25 270 bottom
R18  0R  [R0201]  13.92 74.25 90 bottom
R19  0R  [R0201]  48.08 74.11 180 bottom
R20  0R  [R0201]  48.08 73.4 180 bottom
R21  47K  [R0201]  36.27 73.32 180 bottom
R22  0R  [R0201]  48.08 72.72 180 bottom
R23  0R  [R0201]  36.27 72.66 180 bottom
R24  10K  [R0201]  46.55 72.52 0 bottom
R25  0R  [R0201]  48.08 72.01 180 bottom
R26  10K  [R0201]  41.29 74.83 270 bottom
R27  10K  [R0201]  36.27 71.89 0 bottom
R28  10K  [R0201]  46.55 71.81 0 bottom
R29  10K  [R0201]  9.06 71.6 0 bottom
R30  2.2K  [R0201]  48.08 71.34 0 bottom
R31  10K  [R0201]  36.27 71.23 0 bottom
R32  100K  [R0201]  40.63 74.83 90 bottom
R33  10K  [R0201]  46.55 71.09 0 bottom
R34  DNP  [R0201]  15.06 70.78 0 bottom
R35  DNP  [R0201]  15.06 71.44 180 bottom
R36  2.2K  [R0201]  48.08 70.66 0 bottom
R37  453K  [R0201]  39.99 74.83 270 bottom
R38  10K  [R0201]  46.55 70.41 0 bottom
R39  100K  [R0201]  38.6 74.83 90 bottom
R40  10K  [R0201]  37.93 74.83 270 bottom
R41  0R  [R0201]  48.08 69.22 180 bottom
R42  10K  [R0201]  46.55 69.24 0 bottom
R43  0R  [R0201]  37.28 74.83 270 bottom
R44  0R  [R0201]  9.78 67.44 0 bottom
R45  0R  [R0201]  18.03 66.57 180 bottom
R46  10K  [R0201]  18.03 65.89 180 bottom
R47  0R  [R0201]  8.67 65.27 180 bottom
R48  0R  [R0201]  37.03 64.52 270 bottom
R49  10K  [R0201]  38.7 64.5 90 bottom
R50  10K  [R0201]  40.87 62.51 270 bottom
R51  10K  [R0201]  34.44 62.49 90 bottom
R52  10K  [R0201]  33.55 62.49 270 bottom
R53  10K  [R0201]  39.9 62.45 90 bottom
R54  10K  [R0201]  16.09 60.8 0 bottom
R55  10K  [R0201]  14.9 60.8 0 bottom
R56  5.6K  [R0402]  9.6 59.89 270 bottom
R57  10K  [R0201]  13.3 58.7 270 bottom
R58  240R  [R0201]  43.54 57.38 180 bottom
R59  240R  [R0201]  43.54 56.21 180 bottom
R60  0R  [R0201]  14.66 53.73 180 bottom
R61  2.2K  [R0201]  11.58 53.21 270 bottom
R62  2.2K  [R0201]  10.92 53.21 270 bottom
R63  10K  [R0201]  14.66 53.06 0 bottom
R64  10K  [R0201]  33.4 52.81 90 bottom
R65  100K  [R0201]  14.66 52.39 180 bottom
R66  49.9R  [R0201]  25.31 51.06 270 bottom
R67  3.4K  [R0201]  26.76 47.05 270 bottom
R68  10K  [R0201]  28.07 47.04 90 bottom
R69  16.5K  [R0201]  27.41 47.04 90 bottom
R70  499R  [R0201]  23.01 41.55 180 bottom
R71  499R  [R0201]  23.01 40.85 180 bottom
R72  499R  [R0201]  23.01 40.21 180 bottom
R73  499R  [R0201]  23.01 38.71 180 bottom
R74  499R  [R0201]  23.01 37.35 180 bottom
R75  10K  [R0201]  8.8 36.94 270 bottom
R76  10K  [R0201]  11.05 35.1 180 bottom
R77  10K  [R0201]  12.65 35.51 270 bottom
R78  10K  [R0201]  11.96 35.51 90 bottom
R79  3.01K  [R0402]  46.1 34.54 0 bottom
R80  1.69K  [R0402]  9.04 31.15 0 bottom
R81  3.57K  [R0402]  9.02 30.19 180 bottom
R82  2.2K  [R0201]  9.35 28.55 180 bottom
R83  2.2K  [R0201]  9.35 27.86 180 bottom
R84  10K  [R0201]  36.4 26.14 90 bottom
R85  10K  [R0201]  33.2 25.76 90 bottom
R86  10K  [R0201]  34.58 25.14 270 bottom
R87  10K  [R0201]  35.23 25.12 270 bottom
R88  10K  [R0201]  33.87 24.39 270 bottom
R89  10K  [R0201]  33.2 24.38 90 bottom
R90  10K  [R0201]  32.54 24.38 90 bottom
R91  10K  [R0201]  31.88 24.38 90 bottom
R92  10K  [R0201]  31.22 24.38 90 bottom
R93  10K  [R0201]  30.56 24.38 90 bottom
R94  10K  [R0201]  29.9 24.38 90 bottom
R95  10K  [R0201]  29.24 24.38 90 bottom
R96  10K  [R0201]  28.55 24.38 90 bottom
R97  10K  [R0201]  34.56 23.76 90 bottom
R98  10K  [R0201]  35.23 23.75 90 bottom
R99  10K  [R0201]  26.21 21.18 90 bottom
R100  11K  [R0402]  16.28 20.35 0 bottom
R101  49.9R  [R0201]  38.45 20.21 90 bottom
R102  0R  [R0201]  50.94 19.43 270 bottom
R103  0R  [R0201]  50.28 19.43 270 bottom
R104  10K  [R0201]  51.62 19.42 90 bottom
R105  33R  [R0201]  52.28 19.41 270 bottom
R106  0R  [R0201]  47.78 19.41 0 bottom
R107  10K  [R0201]  47.78 18.73 180 bottom
R108  10K  [R0201]  49.03 17.77 90 bottom
R109  20K  [R0201]  27.86 17.48 90 bottom
R110  100K  [R0201]  23.5 17.37 270 bottom
R111  10K  [R0201]  49.69 16.57 270 bottom
R112  10K  [R0201]  49.03 16.57 270 bottom
R113  5.76K  [R0402]  11.33 7.18 270 bottom
R114  5.76K  [R0402]  10.33 7.18 270 bottom
R115  5.76K  [R0402]  9.37 7.18 270 bottom
R116  2.49K  [R0201]  11.33 5.69 270 bottom
R117  2.49K  [R0201]  10.33 5.69 270 bottom
R118  2.49K  [R0201]  9.37 5.69 270 bottom
R119  470R  [R0402]  11.33 4.14 270 bottom
R120  470R  [R0402]  10.33 4.14 270 bottom
R121  470R  [R0402]  9.37 4.14 270 bottom
R122  0R  [R0805]  54.9 13.34 270 top
R123  300R  [R0402]  13.01 82.08 180 top
R124  680R  [R0402]  14.84 82.06 0 top
R125  0R  [R0201]  13.77 80.59 90 top
R126  6.2K  [R0201]  14.43 80.59 90 top
R127  6.2K  [R0201]  15.09 80.59 90 top
R128  0R  [R0201]  15.74 80.59 270 top
R129  2.2K  [R0201]  16.52 80.59 270 top
R130  2.2K  [R0201]  17.2 80.59 270 top
R131  0R  [R0201]  30.45 79.77 180 top
R132  10K  [R0201]  27.23 79.49 0 top
R133  0R  [R0201]  22.36 80.52 270 top
R134  0R  [R0201]  23.17 79.34 90 top
R135  10K  [R0201]  23.81 79.34 270 top
R136  0R  [R0201]  18.03 79.25 180 top
R137  10K  [R0201]  26.33 79.12 270 top
R138  0R  [R0201]  28.8 78.49 270 top
R139  0R  [R0201]  29.48 79.08 270 top
R140  0R  [R0201]  28.13 78.49 270 top
R141  100K  [R0201]  32 79.05 270 top
R142  2.4K  [R0402]  11.88 79.05 90 top
R143  2.2K  [R0201]  32.65 79.04 90 top
R144  0R  [R0201]  27.23 78.81 0 top
R145  0R  [R0201]  10.81 78.66 0 top
R146  10K  [R0201]  35.26 78.35 0 top
R147  10K  [R0201]  18.36 78.3 270 top
R148  10K  [R0201]  32.31 78.12 0 top
R149  10K  [R0201]  10.81 77.98 0 top
R150  10K  [R0201]  32.9 76.73 90 top
R151  5.1K  [R0402]  8.48 75.15 180 top
R152  0R  [R0201]  35.56 74.58 270 top
R153  10K  [R0201]  21.88 72.98 90 top
R154  0R  [R0201]  21.22 72.98 90 top
R155  0R  [R0201]  33.38 72.72 270 top
R156  5.1K  [R0402]  8.43 72.03 180 top
R157  10K  [R0201]  29.76 69.93 90 top
R158  0R  [R0201]  20.21 68.63 90 top
R159  0R  [R0201]  19.55 68.63 90 top
R160  47K  [R0201]  10.97 67.41 0 top
R161  33R  [R0201]  17.58 67.23 180 top
R162  0R  [R0201]  20.37 67.22 0 top
R163  0R  [R0201]  25.16 67.11 90 top
R164  2.2K  [R0201]  7.73 66.56 270 top
R165  2.2K  [R0201]  8.39 66.55 270 top
R166  33R  [R0201]  17.58 66.52 180 top
R167  0R  [R0201]  25.16 65.92 90 top
R168  33K  [R0402]  12.71 65.78 90 top
R169  33R  [R0201]  9.89 65.52 180 top
R170  2.2K  [R0201]  14.72 65.49 270 top
R171  33R  [R0201]  21.51 64.78 180 top
R172  33R  [R0201]  21.51 64.12 180 top
R173  10K  [R0201]  24.61 63.91 270 top
R174  10K  [R0201]  42.25 63.89 180 top
R175  0R  [R0201]  43.82 63.89 180 top
R176  10K  [R0201]  22.47 64.57 270 top
R177  0R  [R0201]  37.98 63.75 90 top
R178  0R  [R0201]  38.71 63.75 90 top
R179  0R  [R0201]  39.42 63.75 90 top
R180  0R  [R0201]  40.11 63.75 90 top
R181  33R  [R0201]  21.51 63.46 180 top
R182  10K  [R0201]  43.82 63.21 0 top
R183  33R  [R0201]  21.51 62.8 180 top
R184  10K  [R0201]  43.82 62.54 180 top
R185  33R  [R0201]  21.51 62.14 180 top
R186  33R  [R0201]  21.51 61.48 180 top
R187  33R  [R0201]  21.51 60.82 180 top
R188  33R  [R0201]  21.51 60.16 180 top
R189  33R  [R0201]  21.51 58.79 180 top
R190  4.99K  [R0402]  23.57 58.33 180 top
R191  33R  [R0201]  21.51 58.1 180 top
R192  33R  [R0201]  21.51 57.44 180 top
R193  1.87K  [R0402]  23.57 57.36 180 top
R194  33R  [R0201]  21.51 56.78 180 top
R195  33R  [R0201]  21.51 56.12 180 top
R196  33R  [R0201]  21.51 55.44 180 top
R197  40.2K  [R0402]  47.76 54.87 0 top
R198  10K  [R0201]  8.08 54.65 180 top
R199  4.81K  [R0402]  47.76 53.9 180 top
R200  240R  [R0201]  46.15 53.85 90 top
R201  10K  [R0201]  24.31 53.83 0 top
R202  10K  [R0201]  9.72 53.7 90 top
R203  10K  [R0201]  10.4 53.7 270 top
R204  33R  [R0201]  12.99 53.7 90 top
R205  33R  [R0201]  13.65 53.7 90 top
R206  33R  [R0201]  14.31 53.7 90 top
R207  33R  [R0201]  14.98 53.7 90 top
R208  33R  [R0201]  15.64 53.7 90 top
R209  33R  [R0201]  16.3 53.7 90 top
R210  33R  [R0201]  16.96 53.7 90 top
R211  33R  [R0201]  17.62 53.7 90 top
R212  33R  [R0201]  18.28 53.7 90 top
R213  33R  [R0201]  18.94 53.7 90 top
R214  33R  [R0201]  19.6 53.7 90 top
R215  33R  [R0201]  20.26 53.7 90 top
R216  33R  [R0201]  20.92 53.7 90 top
R217  10K  [R0201]  24.31 53.17 0 top
R218  9.53K  [R0402]  16.34 52.04 270 top
R219  10K  [R0201]  22.05 50.82 180 top
R220  1M  [R0201]  16.9 48.31 270 top
R221  0R  [R0201]  22.14 48.05 0 top
R222  0R  [R0201]  46.02 47.55 180 top
R223  10K  [R0201]  25.9 46.72 90 top
R224  1M  [R0201]  46.29 44.65 90 top
R225  47K  [R0201]  4.42 44.6 270 top
R226  100K  [R0201]  1.72 44.6 270 top
R227  10K  [R0201]  2.41 44.6 270 top
R228  10K  [R0201]  3.09 44.6 270 top
R229  10K  [R0201]  3.75 44.6 270 top
R230  0R  [R0201]  46.46 42.8 0 top
R231  499R  [R0201]  23.14 42.57 270 top
R232  0R  [R0201]  46.46 42.14 0 top
R233  0R  [R0201]  46.46 41.47 0 top
R234  0R  [R0201]  46.47 40.77 180 top
R235  4.7K  [R0201]  10.78 39.93 270 top
R236  4.7K  [R0201]  11.49 39.93 270 top
R237  4.7K  [R0201]  12.2 39.93 270 top
R238  4.7K  [R0201]  13.44 39.93 270 top
R239  10K  [R0201]  15.06 39.93 90 top
R240  20K  [R0201]  15.72 39.93 90 top
R241  4.7K  [R0201]  16.36 39.93 270 top
R242  10K  [R0201]  46.24 39.86 270 top
R243  2.2K  [R0201]  5.63 38.69 270 top
R244  2.2K  [R0201]  4.96 38.69 270 top
R245  0R  [R0201]  6.27 38.69 270 top
R246  4.7K  [R0201]  10.78 38.77 90 top
R247  4.7K  [R0201]  11.44 38.77 90 top
R248  4.7K  [R0201]  12.2 38.77 90 top
R249  0R  [R0201]  1.6 38.72 0 top
R250  0R  [R0201]  2.79 38.72 180 top
R251  49.9R  [R0201]  49.06 37.9 90 top
R252  10K  [R0201]  45.66 37.66 90 top
R253  0R  [R0201]  48.14 37.65 180 top
R254  0R  [R0201]  48.14 36.99 180 top
R255  49.9R  [R0201]  49.06 36.73 270 top
R256  0R  [R0201]  47.4 34.69 0 top
R257  0R  [R0201]  47.4 34.03 0 top
R258  0R  [R0201]  7.69 32.7 270 top
R259  0R  [R0201]  8.38 32.7 270 top
R260  0R  [R0201]  47.4 32.02 0 top
R261  10K  [R0201]  20.5 31.94 0 top
R262  0R  [R0201]  47.4 31.34 0 top
R263  10K  [R0201]  20.5 31.25 0 top
R264  499R  [R0201]  47.4 30.68 0 top
R265  10K  [R0201]  48.64 30.68 0 top
R266  5.76K  [R0402]  20.4 29.87 270 top
R267  5.76K  [R0402]  21.57 29.87 270 top
R268  3.01K  [R0402]  47.76 29.85 0 top
R269  10K  [R0201]  18.7 29.44 270 top
R270  5.76K  [R0402]  22.51 28.57 270 top
R271  0R  [R0201]  23.31 28.27 270 top
R272  2.49K  [R0201]  20.26 28.25 90 top
R273  2.49K  [R0201]  21.05 28.25 90 top
R274  2.49K  [R0201]  21.71 28.25 90 top
R275  2.2K  [R0201]  18.69 28.25 270 top
R276  0R  [R0201]  24.21 26.65 180 top
R277  10K  [R0201]  45.47 26.3 0 top
R278  9.09K  [R0402]  43.91 26.16 180 top
R279  49.9R  [R0201]  37.08 26.14 270 top
R280  10K  [R0201]  36.42 26.14 270 top
R281  10K  [R0201]  41.36 26 180 top
R282  0R  [R0201]  24.21 25.99 180 top
R283  0R  [R0201]  27.02 25.76 270 top
R284  10K  [R0201]  33.19 25.76 270 top
R285  10K  [R0201]  35.09 25.76 270 top
R286  0R  [R0201]  24.21 25.33 180 top
R287  10K  [R0201]  43.32 25.03 90 top
R288  10K  [R0201]  43.98 25.03 270 top
R289  0R  [R0201]  24.21 24.67 180 top
R290  10K  [R0201]  38.99 24.44 90 top
R291  0R  [R0201]  39.66 24.44 90 top
R292  0R  [R0201]  40.33 24.44 270 top
R293  2.2K  [R0201]  27.05 24.38 90 top
R294  33R  [R0201]  27.88 24.38 270 top
R295  10K  [R0201]  28.55 24.38 270 top
R296  10K  [R0201]  29.24 24.38 270 top
R297  10K  [R0201]  29.9 24.38 270 top
R298  10K  [R0201]  30.56 24.38 270 top
R299  10K  [R0201]  31.22 24.38 270 top
R300  10K  [R0201]  31.87 24.38 270 top
R301  10K  [R0201]  32.54 24.38 270 top
R302  10K  [R0201]  33.19 24.38 270 top
R303  10K  [R0201]  33.86 24.38 90 top
R304  10K  [R0201]  35.09 24.38 90 top
R305  0R  [R0201]  24.21 24.01 180 top
R306  10K  [R0201]  35.32 22.97 0 top
R307  10K  [R0201]  34.16 22.97 180 top
R308  10K  [R0201]  35.35 22.19 0 top
R309  10K  [R0201]  34.15 22.18 180 top
R310  0R  [R0201]  19.87 17.4 270 top
R311  2.2K  [R0201]  22.14 15.58 270 top
R312  2.2K  [R0201]  22.8 15.58 270 top
R313  10K  [R0201]  21.47 15.57 270 top
R314  10K  [R0201]  36.83 16.61 180 top
R315  4.7K  [R0201]  36.83 15.95 180 top
R316  10K  [R0201]  36.47 15.01 270 top
R317  4.7K  [R0201]  37.14 15.01 270 top
R318  10K  [R0201]  20.81 14.66 270 top
R319  4.7K  [R0201]  37.54 13.69 90 top
R320  0R  [R0402]  1.3 59.7 180 bottom
R321  0R  [R0402]  1.29 58.79 180 bottom
R322  0R  [R0201]  28.13 79.63 90 top
R323  0R  [R0201]  28.79 79.63 90 top
R324  0R  [R0805]  30.16 2.92 270 bottom
R325  0R  [R0805]  1.13 13.89 270 top
R326  200K  [R0201]  20.63 48.25 0 bottom
R327  2.49K  [R0201]  17.43 49.24 0 bottom
R328  2.49K  [R0201]  17.44 49.9 0 bottom
R329  200K  [R0201]  20.64 47.56 180 bottom
R330  1.69K  [R0402]  12.57 79.5 180 bottom
SW1  MTKG63-003A05-74333  [SW3_4P_1D15_4_55X3_45X3_3MM]  18.4 82.62 0 top
TP1  Test Point  [TP30C_SMD]  42.84 79.54 0 bottom
TP2  Test Point  [TP40C_SMD]  45.21 80.01 180 bottom
TP3  Test Point  [TP30C_SMD]  40.81 79.16 0 bottom
TP4  Test Point  [TP30C_SMD]  21.31 78.69 180 bottom
TP5  Test Point  [TP30C_SMD]  41.67 77.41 0 bottom
TP6  Test Point  [TP40C_SMD]  18.82 71.68 180 bottom
TP7  Test Point  [TP30C_SMD]  34.97 70.42 270 bottom
TP8  Test Point  [TP40C_SMD]  17.98 68.9 180 bottom
TP9  Test Point  [TP40C_SMD]  23.19 68.81 270 bottom
TP11  Test Point  [TP40C_SMD]  25.25 68.78 270 bottom
TP12  Test Point  [TP30C_SMD]  36.26 68.54 270 bottom
TP13  Test Point  [TP30C_SMD]  48.17 67.57 180 bottom
TP14  Test Point  [TP30C_SMD]  46.42 67.57 180 bottom
TP15  Test Point  [TP30C_SMD]  44.66 67.57 270 bottom
TP16  Test Point  [TP30C_SMD]  41.09 65.3 270 bottom
TP17  Test Point  [TP40C_SMD]  20.78 67.92 180 bottom
TP18  Test Point  [TP30C_SMD]  48.25 65.81 90 bottom
TP19  Test Point  [TP30C_SMD]  46.43 65.81 90 bottom
TP20  Test Point  [TP30C_SMD]  44.65 65.81 270 bottom
TP21  Test Point  [TP30C_SMD]  42.87 65.3 270 bottom
TP22  Test Point  [TP60C_SMD]  45.58 63.66 180 bottom
TP23  Test Point  [TP40C_SMD]  27.2 63.38 180 bottom
TP24  Test Point  [TP60C_SMD]  45.58 61.12 180 bottom
TP25  Test Point  [TP30C_SMD]  18.01 59.18 180 bottom
TP26  Test Point  [TP40C_SMD]  23.8 57.09 180 bottom
TP27  Test Point  [TP30C_SMD]  45.6 43.92 180 bottom
TP28  Test Point  [TP40C_SMD]  11.43 41.02 180 bottom
TP29  Test Point  [TP30C_SMD]  43.6 40.94 180 bottom
TP30  Test Point  [TP40C_SMD]  46.43 27.64 270 bottom
TP31  Test Point  [TP30C_SMD]  17.09 26.9 90 bottom
TP32  Test Point  [TP40C_SMD]  27.25 25.68 180 bottom
TP33  Test Point  [TP30C_SMD]  18.14 20.37 180 bottom
TP34  Test Point  [TP30C_SMD]  16.38 18.92 90 bottom
TP35  Test Point  [TP30C_SMD]  45.78 35.36 180 top
TP36  Test Point  [TP30C_SMD]  45.78 34.05 180 top
U1  TPS22918DBVR  [SOT23_6]  16.61 78.92 180 bottom
U2  SN74LVC1G08DCKR  [DCK5_2P15X1P4]  16.25 74.25 180 bottom
U3  TPS62A06DRLR  [SOT563]  40.38 72.59 180 bottom
U4  TLV75512PDBVR  [SOT23-5]  12.2 69.59 90 bottom
U5  DS1340U-33+  [SOP8_0D65_3X3X1_1MM]  14.28 66.19 0 bottom
U6  SN74LVC1G08DCKR  [DCK5_2P15X1P4]  15.36 59.18 270 bottom
U7  TCA9801DGKR  [VSSOP8_0D65_3X3X1_1MM]  12.97 49.53 90 bottom
U8  TPS74801DRCRM3  [VSON10_0D5_3X3X1MM]  8.25 33.81 270 bottom
U9  TMUX646ZECR  [DSBGA36_0D4_2_45X2_45X0_5MM]  13.37 33.38 180 bottom
U10  SN74LVC1T45YZPR  [BGA6C50P2X3_89X139X50]  49.05 19.32 180 bottom
U11  TPS2561DRCR  [VSON10_0D5_3X3X1MM]  25.73 18.54 270 bottom
U12  TVS0500DRVR  [WSON6_0D65_2X2X0_8MM]  8.42 77.7 270 top
U13  TPS62872QWRXSRQ1  [VQFN16_0D5_3_55X2_55X1MM]  15.03 77.54 0 top
U14  TPS6521910RSMR  [VQFN32_0D4_4X4X1MM]  26.22 75.54 180 top
U15  SN74LVC1T45YZPR  [BGA6C50P2X3_89X139X50]  34.36 74.29 180 top
U16  BM3301 Module-1313  [E-13_4X13_3-N100_0_75-TOP]  42.88 71.35 90 top
U17  FT24C32A-ELRT  [SOT23-5]  46.56 62.06 0 top
U18  TPS74801DRCRM3  [VSON10_0D5_3X3X1MM]  24.47 61.3 270 top
U19  TPD4E05U06DQAR  [USON10_0D5_2D5X1X0D5MM]  8.64 60.67 90 top
U20  IT66122FN/CX  [QFN64_0D5_9X9MM]  15.79 59.72 180 top
U21  TPD4E05U06DQAR  [USON10_0D5_2D5X1X0D5MM]  8.64 57.71 90 top
U22  B3221PM3BDGUI-U  [BGA200_0D65_15X10X1MM]  36 56.4 180 top
U23  SN74LVC1G08DCKR  [DCK5_2P15X1P4]  22.48 52.85 180 top
U24  TUSB8041RGCR  [QFN64_0D5_9X9X1MM]  11.23 45.78 270 top
U25  SN74LVC2G241DCUR  [U_8_DCU]  2.11 41.57 180 top
U26  XJ722S5AAMW  [BGA594_0D65_18X18MM]  35.49 36.35 90 top
U27  SN74LVC1G08DCKR  [DCK5_2P15X1P4]  18.39 31.99 180 top
U28  DP83867CRRGZR  [QFN48_0D5_7X7MM]  19.44 23.42 0 top
U29  TPD4E05U06DQAR  [USON10_0D5_2D5X1X0D5MM]  11.42 19.35 0 top
U30  TPD4E05U06DQAR  [USON10_0D5_2D5X1X0D5MM]  14.33 19.35 0 top
U31  PCA9306DQER  [X2SON8_0D4_1_4X1X0_4MM]  19.14 49.16 0 bottom
X1  32.768kHz 12.5pF  [X2_SMD_3_2X1_5MM]  14.14 62.93 180 bottom
X2  24MHz 18pF  [X4-SMD-3_2X2_5X1_0MM]  19 48.86 270 top
X3  32.768kHz 9pF  [X2_SMD_3_2X1_5MM]  47.62 46.1 90 top
X4  25MHz  10pF  [X4_SMD_2_0X1_6MM]  48.24 42.42 90 top
X5  25MHz 18pF  [X4_SMD_2_0X1_6MM]  21.49 17.74 180 top

## Library data of the parts
C1-C89 C91 C93-C99 C101-C104 C106-C115 C117-C120 C122 C124-C126 C128-C133 C135-C139 C141 C142 C144-C148 C150-C152 C154 C155 C157-C159 C161-C169 C171-C296 C299-C302 C304-C318 C321-C341 C345 C346 C351-C356 C360-C363 C368 C369 C372-C379 C384-C386 C392 C397 C403 C405-C417 = CC
C90 C92 C100 C105 C116 C121 C123 C127 C134 C140 C143 C149 C153 C156 C160 C170 C297 C298 C303 C319 C320 C342-C344 C347-C350 C357-C359 C364-C367 C370 C371 C380-C383 C387-C391 C393-C396 C398-C401 = CC_EMIFIL_3P
C402 C404 = CT
D1-D7 D9 D11-D14 D17-D23 = DIODE TVS BI-DIR
D8 D15 D16 D24 = D
D10 = BZX84C6V8LT1G
D25-D37 = ESD122DMX
F1 = Fuse
FB1 FB4-FB38 = FB
J1 = MicroSD Card_10+4P
J2 = Header 40+2P
J3 J4 = Header 2X5_1
J5 J6 = RF ANT 3P
J7 = FPC 16+4P
J8 = USB2.0_Type C_16+6P#1
J9 = JST_2+2P
J10 J11 = Header 1x2
J12 = Micro HDMI_Type D_19P
J13 = JST_3+2P
J14 = Header 2X20 Of RPI
J15 J16 = FPC 22+4P
J17 = Header 2x2
J18 = JST_4+2P
J19 = RJ45_POE_LPJG0926HENL
J20 J21 = USB3.0_Dual Type A_18+4P
L1 L4-L8 L10-L12 = L
L2 L3 L9 L13-L28 = CL
LED1 = LED_12Greed_34Red
OSC1 = OSC_4P
Q1-Q3 = NMOS_123
R1-R4 R6 R8-R10 R12-R22 R24-R282 R284-R290 R293-R330 = R
R5 R7 R11 R23 R292 = R: signal model: R_R0201_0R_0R
R283 R291 = R: signal model: R_R0201_DISCRETE_0R_0R
SW1 = Tactile Switch_3+4P
TP1-TP9 TP11-TP36 = Test Point
U1 = TPS22918DBV
U2 U6 U23 U27 = SN74LVC1G08DCKR
U3 = TPS62A06
U4 = LDO_5P_FB_EN
U5 = DS1340
U7 = TCA9801DGK
U8 U18 = TPS74801DRCR
U9 = TMUX646
U10 U15 = SN74LVC1T45YZPR
U11 = TPS2561
U12 = TVS0500DRVR
U13 = TPS62872_VQFN16
U14 = TPS65219
U16 = WL1835MOD
U17 = MEM_24LC32_SOT23-5
